# Altium PCB adl5960-devboard.PcbDoc (part 1 of 2)
Units mm, origin at the board's own origin, x right, y up, seen from the top; angles counter-clockwise.
Board outline 70 x 110 mm, 4 copper layers (Top Layer, Inner 1, Inner 2, Bottom Layer), stack 1.072 mm thick; 69 components, 54 nets, 253 pads, 0 vias.
Unrouted connection lines stored in the file: 176.
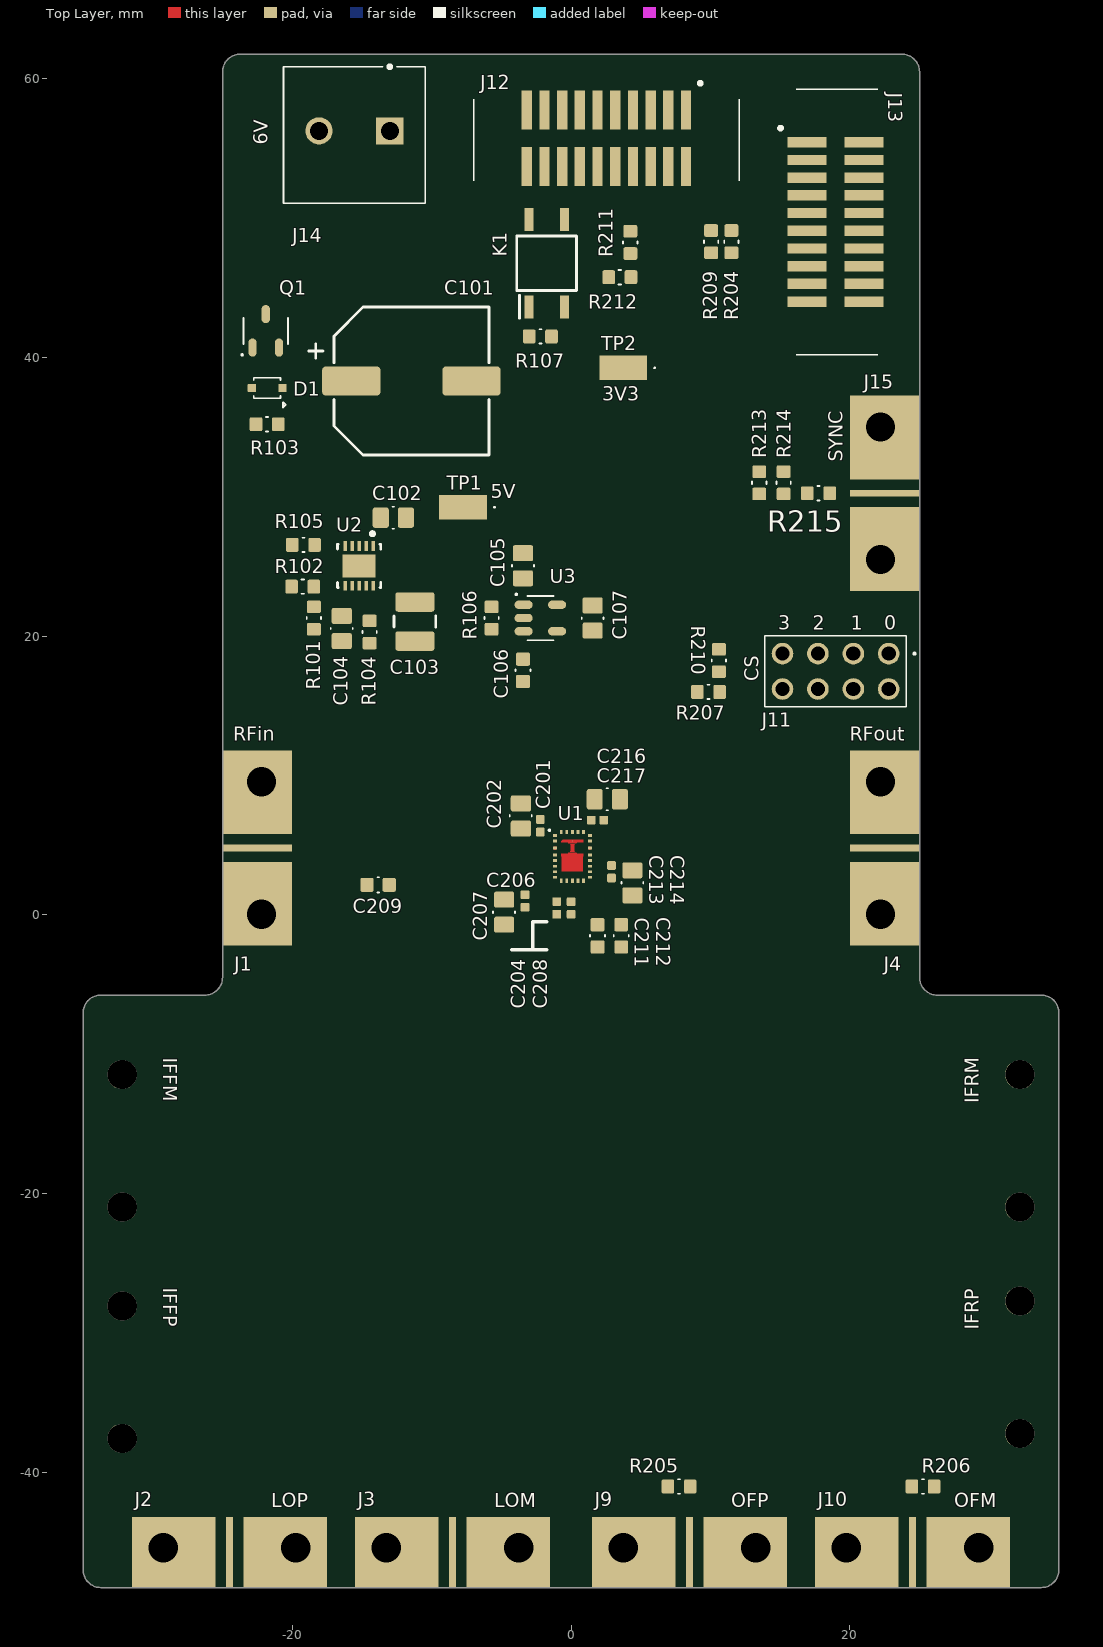
[diagram p0: Top Layer view]
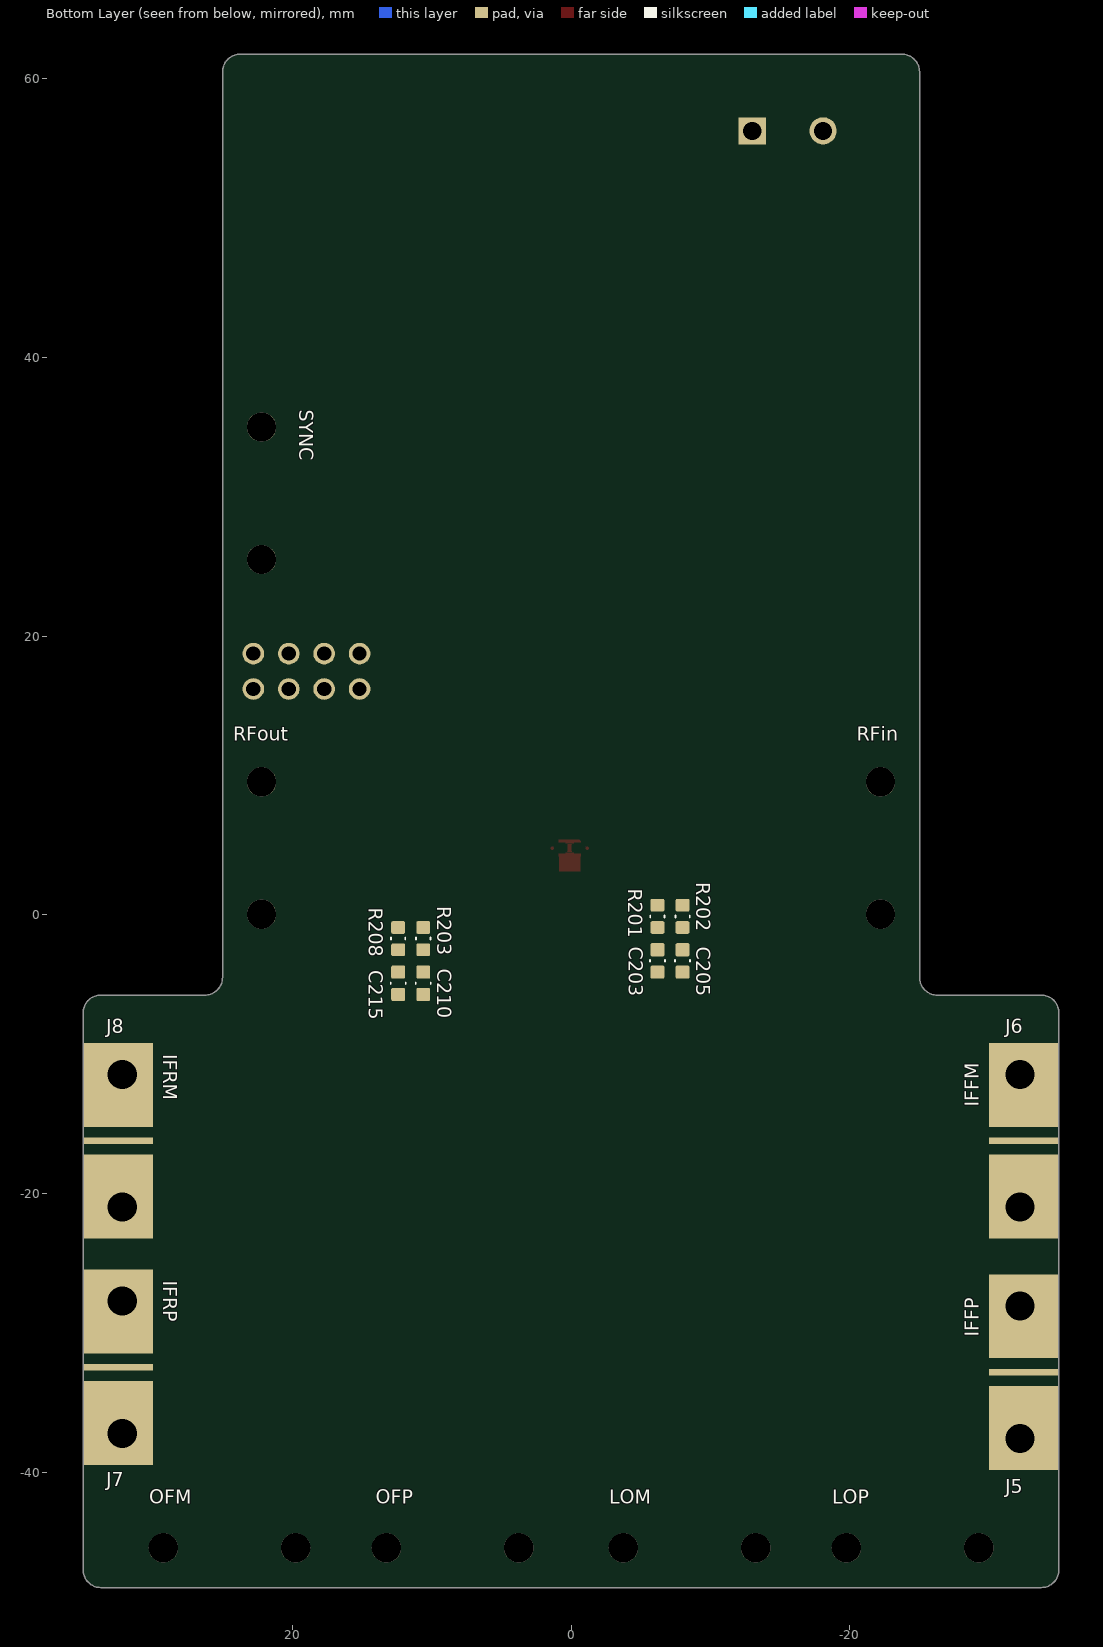
[diagram p1: Bottom Layer view, seen from below]

## Layer stack, top to bottom
Top Solder: solder mask 0.02, Solder Resist, Dk 3.9
Top Layer: signal copper 0.03
Dielectric 1: core 0.254, RO4350B, Dk 3.66
Inner 1: signal copper 0.012
Dielectric 2: prepreg 0.18, PR7628, Dk 4.8
Dielectric 3: prepreg 0.12, PR2116, Dk 4.8
Dielectric 4: prepreg 0.18, PR7628, Dk 4.8
Inner 2: signal copper 0.012
Dielectric 5: core 0.254, RO4350B, Dk 3.66
Bottom Layer: signal copper 0.03
Bottom Solder: solder mask 0.02, Solder Resist, Dk 3.9

## Board outline
-33.73,-48.25 cw(c-33.73,-46.98) -35,-46.98 -35,-7.02 cw(c-33.73,-7.02) -33.73,-5.75 -26.27,-5.75 ccw(c-26.27,-4.48) -25,-4.48 -25,60.48 cw(c-23.73,60.48) -23.73,61.75 23.73,61.75 cw(c23.73,60.48) 25,60.48 25,-4.48 ccw(c26.27,-4.48) 26.27,-5.75 33.73,-5.75 cw(c33.73,-7.02) 35,-7.02 35,-46.98 cw(c33.73,-46.98) 33.73,-48.25

## Design rules (kind name [scope] priority, off if disabled: settings)
Clearance [All] p1: gap=0.254 ignorepadtopadclearanceinfootprint=FALSE
DiffPairsRouting [All] p1: maxlimit=0.254 minlimit=0.254 mostfreqgap=0.254 toplayer_minwidth=0.381 toplayer_maxwidth=0.381 toplayer_prefwidth=0.381 midlayer1_minwidth=0.381 midlayer1_maxwidth=0.381 midlayer1_prefwidth=0.381 midlayer2_minwidth=0.381 midlayer2_maxwidth=0.381 midlayer2_prefwidth=0.381 bottomlayer_minwidth=0.381 bottomlayer_maxwidth=0.381 bottomlayer_prefwidth=0.381 maxuncoupledlength=12.7
PolygonConnect [All] p1: connectstyle=Relief reliefconductorwidth=0.254 reliefentries=4 polygonreliefangle="90 Angle" airgapwidth=0.254
RoutingVias [All] p1: holewidth=0.711 width=1.27 viastyle="Through Hole" minholewidth=0.711 minwidth=1.27 maxholewidth=0.711 maxwidth=1.27
SolderMaskExpansion [All] p1: expansion=0 istentingtop=FALSE
SupplyNets "Schematic Supply Nets_3" [InNet('+3V3')] p1: voltage=0.000
SupplyNets "Schematic Supply Nets_2" [InNet('+6')] p2: voltage=0.000
SupplyNets "Schematic Supply Nets_1" [InNet('GND')] p3: voltage=0.000
SupplyNets "Schematic Supply Nets" [InNet('+5')] p4: voltage=0.000
Width [All] p1: maxlimit=0.254 minlimit=0.254 preferedwidth=0.254
29 further rules are at their usual default settings.

## Classes and differential pairs
component class adl5960-power: C101 C102 C103 C104 C105 C106 C107 D1 J14 K1 Q1 R101 R102 R103 R104 R105 R106 R107 TP1 TP2 U2 U3
component class adl5960-main: C201 C202 C203 C204 C205 C206 C207 C208 C209 C210 C211 C212 C213 C214 C215 C216 C217 J1 J2 J3 J4 J5 J6 J7 J8 J9 J10 J11 J12 J13 J15 R201 R202 R203 R204 R205 R206 R207 R208 R209 R210 R211 R212 R213 R214 R215 U1
differential pair LO: +LO_P -LO_N
differential pair IFR: +IFR_P -IFR_N
differential pair IFF: +IFF_P -IFF_N

## Components (designator, comment, footprint, x,y, rotation, side; value= is the part's Value field where it differs from the comment)
C101 "470u" cap-ae-d10-h12.4-av -11.45,38.3 r0 top
C102 "4.7u 10%" c-0805 -12.75,28.5 r180 top value=4.7u
C103 "22u 10%" c-1210 -11.2,21.05 r90 top value=22u
C104 "470n" c-0805 -16.45,20.55 r90 top
C105 "1u 5%" c-0805 -3.45,25.05 r270 top value=1u
C106 "100n 5%" c-0603 -3.45,17.55 r90 top value=100n
C107 "1u 5%" c-0805 1.55,21.3 r90 top value=1u
C201 "1n 10%" c-0402 -2.2,6.4 r270 top value=1n
C202 "4.7u 10%" c-0805 -3.6,7.1 r90 top value=4.7u
C203 "100n 5%" c-0603 -6.2,-3.3 r270 bottom value=100n
C204 "1n 5%" c-0402 -1.025,0.5 r90 top value=1n
C205 "100n 5%" c-0603 -8,-3.3 r270 bottom value=100n
C206 "1n 10%" c-0402 -3.3,1 r270 top value=1n
C207 "4.7u 10%" c-0805 -4.8,0.2 r90 top value=4.7u
C208 "1n 5%" c-0402 0,0.5 r90 top value=1n
C209 "100n 5%" c-0603 -13.843,2.159 r0 top value=100n
C210 "100n 5%" c-0603 10.6,-4.9 r270 bottom value=100n
C211 "100n 5%" c-0603 1.9,-1.5 r90 top value=100n
C212 "100n 5%" c-0603 3.6,-1.5 r270 top value=100n
C213 "1n 10%" c-0402 2.9,3.1 r90 top value=1n
C214 "4.7u 10%" c-0805 4.4,2.3 r270 top value=4.7u
C215 "100n 5%" c-0603 12.4,-4.9 r270 bottom value=100n
C216 "4.7u 10%" c-0805 2.6,8.3 r180 top value=4.7u
C217 "1n 10%" c-0402 1.9,6.8 r0 top value=1n
D1 "BZX384-C10" sod-323 -21.8,37.8 r180 top
J1 "SMA" 32K243-40ML5 -25,4.8 r90 top
J2 "SMA" 32K243-40ML5 -24.5,-48.2 r180 top
J3 "SMA" 32K243-40ML5 -8.5,-48.2 r180 top
J4 "SMA" 32K243-40ML5 25,4.8 r270 top
J5 "SMA" 32K243-40ML5 -35,-32.8 r270 bottom
J6 "SMA" 32K243-40ML5 -35,-16.2 r270 bottom
J7 "SMA" 32K243-40ML5 35,-32.45 r90 bottom
J8 "SMA" 32K243-40ML5 35,-16.2 r90 bottom
J9 "SMA" 32K243-40ML5 8.5,-48.2 r180 top
J10 "SMA" 32K243-40ML5 24.5,-48.2 r180 top
J11 "Header 2x4" Header-2x4-THT-P2.54 22.79,18.75 r180 top
J12 "SHF-110-01-L-D-SM" SHF-110-01-L-D-SM 2.535,55.717 r180 top
J13 "SHF-110-01-L-D-SM" SHF-110-01-L-D-SM 18.968,49.715 r270 top
J14 "Screw Terminal 1x2" 1715721 -13,56.25 r180 top
J15 "DNP" 32K243-40ML5 25,30.25 r270 top
K1 "AQY412S" sop-4 -1.75,46.75 r90 top value=2.5Ω
Q1 "DMP3099L-7" sot-23-3-p0.95 -21.9,41.9 r90 top
R101 "150k 1%" r-0603 -18.45,21.3 r90 top value=150k
R102 "10k 1%" r-0603 -19.25,23.55 r180 top value=10k
R103 "100k 5%" r-0603 -21.8,35.2 r180 top value=100k
R104 "49.9k 0.1%" r-0603 -14.45,20.3 r90 top value=49.9k
R105 "430 1%" r-0603 -19.2,26.55 r0 top value=430
R106 "100k 5%" r-0603 -5.7,21.3 r90 top value=100k
R107 "330 1%" r-0603 -2.2,41.5 r0 top value=330
R201 "49.9 1%" r-0603 -6.2,-0.1 r90 bottom value=49.9
R202 "49.9 1%" r-0603 -8,-0.1 r90 bottom value=49.9
R203 "49.9 1%" r-0603 10.6,-1.7 r90 bottom value=49.9
R204 "1k 1%" r-0603 11.5,48.3 r90 top value=1k
R205 "56 1%" r-0603 7.75,-41 r0 top value=56
R206 "56 1%" r-0603 25.25,-41 r180 top value=56
R207 "1k 1%" r-0603 9.857,16 r0 top value=1k
R208 "49.9 1%" r-0603 12.4,-1.7 r90 bottom value=49.9
R209 "1k 1%" r-0603 10.05,48.3 r90 top value=1k
R210 "10k 1%" r-0603 10.607,18.25 r270 top value=10k
R211 "1k 1%" r-0603 4.25,48.25 r270 top value=1k
R212 "100k 5%" r-0603 3.5,45.75 r0 top value=100k
R213 "1k 1%" r-0603 13.5,31 r270 top value=1k
R214 "100k 5%" r-0603 15.25,31 r270 top value=100k
R215 "DNP" r-0603 17.75,30.25 r180 top value=0
TP1 "Test Point" tp-keystone-5015 -7.75,29.25 r180 top
TP2 "Test Point" tp-keystone-5015 3.75,39.25 r180 top
U1 "ADL5960ACCZ" ADL5960ACCZ 0.1,4.2 r0 top
U2 "LT3045" LT3045HDD -15.2,25.05 r270 top
U3 "TLV75533" sot-23-5-p0.95 -2.2,21.3 r0 top

## Footprints (in the part's own frame and the unit in brackets; to place one, negate y for a bottom-side part, rotate by r counter-clockwise, add the part's x,y. Pads: shape width x height; smd on the part's side, far side on the other; paste and mask are expansions set on the pad)
32K243-40ML5 [mm]
  rect 0.48x5 smd paste+0: 1(0,-2.5)
  rect 6x5 smd paste+0: 2(-4,-2.5) 2(4,-2.5)
  round 2.1 hole 2.1 unplated: MH1(-4.75,-2.8) MH2(4.75,-2.8)
  body extent -7,-5 7,9.5, height 4.88
1715721 [mm] "Single-row, 2-pin screw terminal. Phoenix Contact 1715721"
  rect 1.95x1.95 hole 1.3: 1(0,0)
  round 1.95 hole 1.3: 2(5.08,0)
  silkscreen extent -2.54,-4.65 7.62,5.2, body extent -3.18,-4.61 7.55,5.22, height 14.2
ADL5960ACCZ [mm] "LGA, 26-Leads, Body 3.00x4.00mmx0.78mm"
  rect 0.3x0.2 smd: 1(-1.25,1.5) 2(-1.25,1.1) 3(-1.25,0.6) 4(-1.25,0.1) 5(-1.25,-0.3) 6(-1.25,-0.7) 7(-1.25,-1.1) 8(-1.25,-1.5) 14(1.25,-1.5) 15(1.25,-1.1) 16(1.25,-0.7) 17(1.25,-0.3) 18(1.25,0.1) 19(1.25,0.6) 20(1.25,1.1) 21(1.25,1.5)
  rect 0.2x0.3 smd: 9(-0.8,-1.75) 10(-0.4,-1.75) 11(0,-1.75) 12(0.4,-1.75) 13(0.8,-1.75) 22(0.8,1.75) 23(0.4,1.75) 24(0,1.75) 25(-0.4,1.75) 26(-0.8,1.75)
  round 0.025 smd: 27(-0.025,0.625) 27(0.025,1.1) 27(0.05,-0.375)
  silkscreen extent -1.71,1.81 -1.59,1.94, body extent -1.5,-2 1.5,2, height 0.68
c-0402 [mm] "Chip Capacitor, 2-Leads, Body 1.00x0.50mm, IPC Medium Density"
  rrect25% 0.62x0.62 smd: 1(-0.45,0) 2(0.45,0)
  body extent -0.5,-0.23 0.5,0.27, height 0.5
c-0603 [mm] "Chip Capacitor, 2-Leads, Body 1.60x0.80mm, IPC Medium Density"
  rrect25% 0.95x1 smd: 1(-0.8,0) 2(0.8,0)
  silkscreen extent -0.06,-0.54 0.06,0.54, body extent -0.8,-0.4 0.8,0.4, height 0.8
c-0805 [mm] "Chip Capacitor, 2-Leads, Body 2.00x1.25mm, IPC Medium Density"
  rrect25% 1.15x1.45 smd: 1(-0.9,0) 2(0.9,0)
  silkscreen extent -0.06,-0.79 0.06,0.79, body extent -1,-0.63 1,0.63, height 1.25
c-1210 [mm] "Chip Capacitor, 2-Leads, Body 3.20x2.50mm, IPC Medium Density"
  rrect25% 1.4x2.8 smd: 1(-1.4,0) 2(1.4,0)
  silkscreen extent -0.4,-1.5 0.4,1.5, body extent -1.6,-1.25 1.6,1.25, height 2.02
cap-ae-d10-h12.4-av [mm] "Aluminium electrolytic/polymer V-chip, D10 x H12.4, anti-vibration (KEMET MS-AV), body 10.80x10.30x12.90 mm max, pads per KEMET A786 datasheet"
  rrect25% 4.175x2.1 smd: 1(-4.313,0) 2(4.312,0)
  silkscreen extent -7.37,-5.31 5.56,5.31, body extent -5.6,-5.24 5.6,5.24, height 13.24
Header-2x4-THT-P2.54 [mm] "2x4 vertical male pin header, 2.54 mm pitch, plated through-hole, 8 positions."
  round 1.55 hole 1.02: 1(0,0) 2(0,2.54) 3(2.54,0) 4(2.54,2.54) 5(5.08,0) 6(5.08,2.54) 7(7.62,0) 8(7.62,2.54)
  silkscreen extent -1.9,-1.27 8.89,3.81, body extent -1.28,-1.27 8.88,3.81, height 8.13
LT3045HDD [mm]
  rect 0.7x0.25 smd paste+0 mask+0: 1(-1.425,1) 2(-1.425,0.5) 3(-1.425,0) 4(-1.425,-0.5) 5(-1.425,-1) 6(1.425,-1) 7(1.425,-0.5) 8(1.425,0) 9(1.425,0.5) 10(1.425,1)
  rect 1.65x2.38 smd paste+0 mask+0: 11(0,0)
  silkscreen extent -2.42,-1.55 1.55,1.55, body extent -1.88,-1.65 1.88,1.65, height 0.25
r-0603 [mm] "Chip Resistor, 2-Leads, Body 1.60x0.80mm, IPC Medium Density"
  rrect25% 0.9x1 smd: 1(-0.8,0) 2(0.8,0)
  silkscreen extent -0.09,-0.51 0.09,0.51, body extent -0.85,-0.45 0.85,0.45, height 0.55
SHF-110-01-L-D-SM [mm]
  rect 0.74x2.795 smd: 1(-5.715,-2.033) 2(-5.715,2.033) 3(-4.445,-2.033) 4(-4.445,2.033) 5(-3.175,-2.033) 6(-3.175,2.033) 7(-1.905,-2.033) 8(-1.905,2.033) 9(-0.635,-2.033) 10(-0.635,2.033) 11(0.635,-2.033) 12(0.635,2.033) 13(1.905,-2.033) 14(1.905,2.033) 15(3.175,-2.033) 16(3.175,2.033) 17(4.445,-2.033) 18(4.445,2.033) 19(5.715,-2.033) 20(5.715,2.033)
  silkscreen extent -9.53,-3.99 9.53,3.05, body extent -9.53,-3.05 9.53,3.05, height 5.33
sod-323 [mm] "SOD-323, 2 leads, 1.7x1.25x1.1 mm"
  rrect25% 0.6x0.6 smd: 1(-1.1,0) 2(1.1,0)
  silkscreen extent -1.34,-0.74 0.96,1.4, body extent -1.24,-0.62 1.24,0.63, height 0.94
sop-4 [mm]
  rect 1.65x0.65 smd: 1(-3.125,1.27) 2(-3.125,-1.27) 3(3.125,-1.27) 4(3.125,1.27)
  silkscreen extent -3.95,-2.15 1.95,2.15, body extent -3.4,-2.15 3.4,2.15, height 2.11
sot-23-3-p0.95 [mm] "SOT23, 3-Leads, Body 2.90x2.80mm, Pitch 0.95mm, IPC Medium Density"
  oval 1.3x0.6 smd: 1(-1.2,0.95) 2(-1.2,-0.95) 3(1.2,0)
  silkscreen extent -1.79,-1.59 0.94,1.76, body extent -1.25,-1.5 1.25,1.5, height 1.2
sot-23-5-p0.95 [mm] "SOT23, 5-Leads, Body 2.90x2.80mm, Pitch 0.95mm, IPC Medium Density"
  oval 1.3x0.6 smd: 1(-1.2,0.95) 2(-1.2,0) 3(-1.2,-0.95) 4(1.2,-0.95) 5(1.2,0.95)
  silkscreen extent -1.79,-1.59 0.94,1.76, body extent -1.4,-1.45 1.4,1.45, height 1.55
tp-keystone-5015 [mm]
  rect 3.43x1.78 smd: 1(0,0)
  silkscreen extent -2.3,-0.05 -2.2,0.05, body extent -1.33,-0.51 1.33,0.51, height 1.52

## Part data
C101: library part Capacitor-Polar, "Polarized capacitor", Manufacturer=KEMET, Manufacturer Part Number=A786MS477M1ELAV012, Tolerance=20%, Voltage Rating=25V
C102 C202 C207 C214 C216: library part Capacitor, "Generic non-polarized capacitor", Dielectric=X7R, Manufacturer=KEMET, Manufacturer Part Number=C0805C475K4RACTU, Tolerance=10%, Voltage Rating=16V
C103: library part Capacitor, "Generic non-polarized capacitor", Dielectric=X7R, Manufacturer=KEMET, Manufacturer Part Number=C1210C226K4RACTU, Tolerance=10%, Voltage Rating=16V
C104: library part Capacitor, "Generic non-polarized capacitor", Dielectric=X7R, Manufacturer=KEMET, Manufacturer Part Number=C0805C474J4RACAUTO, Tolerance=5%, Voltage Rating=16V
C105 C107: library part Capacitor, "Generic non-polarized capacitor", Dielectric=X7R, Manufacturer=KEMET, Manufacturer Part Number=C0805C105J4RAC7210, Tolerance=5%, Voltage Rating=16V
C106 C203 C205 C209 C210 C211 C212 C215: library part Capacitor, "Generic non-polarized capacitor", Dielectric=X7R, Manufacturer=KEMET, Manufacturer Part Number=C0603C104J4RACTU, Tolerance=5%, Voltage Rating=16V
C201 C206 C213 C217: library part capacitor, "Generic non-polarized capacitor", Dielectric=C0G, Manufacturer=KEMET, Manufacturer Part Number=C0402C102K8GACTU, Tolerance=10%, Voltage Rating=10V
C204 C208: library part Capacitor, "Generic non-polarized capacitor", Dielectric=C0G, Manufacturer=KEMET, Manufacturer Part Number=C0402C102J4GACTU, Tolerance=5%, Voltage Rating=16V
D1: library part BZX384-C10,115, "Diode Zener Single 10V 5% 300mW 2-Pin SOD-323 T/R", Case/Package=SC, Collector Emitter Breakdown Voltage=32V, Collector Emitter Saturation Voltage=-300mV, Manufacturer=Nexperia, Manufacturer Lifecycle Status="RELEASED FOR SUPPLY", Max Collector Current=100mA, Max Operating Temperature=150°C, Max Power Dissipation=300mW, Max Reverse Leakage Current=200nA, Min Operating Temperature=-65°C, Ratings=AEC-Q101, Reference Voltage=10V, Reverse Standoff Voltage=7V, Supplier Part Number=1787095, Test Current=5mA, Tolerance=5%, Category="Zener Diodes", China RoHS=Compliant, ComponentLink1Description=https://datasheet.octopart.com:443/BZX384-C10%2C115-Nexperia-datasheet-8360268.pdf?src-supplier=IHS, ComponentLink1URL=https://datasheet.octopart.com:443/BZX384-C10%2C115-Nexperia-datasheet-8360268.pdf?src-supplier=IHS, ComponentLink2Description=https://datasheet.octopart.com:443/BZX384-C10%2C115-Nexperia-datasheet-155662751.pdf?src-supplier=Newark, ComponentLink2URL=https://datasheet.octopart.com:443/BZX384-C10%2C115-Nexperia-datasheet-155662751.pdf?src-supplier=Newark, ComponentLink3Description=https://datasheet.octopart.com:443/BZX384-C10%2C115-NXP-Semiconductors-datasheet-10052903.pdf?src-supplier=Newark, ComponentLink3URL=https://datasheet.octopart.com:443/BZX384-C10%2C115-NXP-Semiconductors-datasheet-10052903.pdf?src-supplier=Newark, ComponentLink4Description=https://datasheet.octopart.com:443/BZX384-C10%2C115-Nexperia-datasheet-79471522.pdf?src-supplier=LKR, ComponentLink4URL=https://datasheet.octopart.com:443/BZX384-C10%2C115-Nexperia-datasheet-79471522.pdf?src-supplier=LKR, ComponentLink5Description=https://datasheet.octopart.com:443/BZX384-C10%2C115-Nexperia-datasheet-68321567.pdf?src-supplier=element14+APAC, ComponentLink5URL=https://datasheet.octopart.com:443/BZX384-C10%2C115-Nexperia-datasheet-68321567.pdf?src-supplier=element14+APAC, ComponentLink6Description=https://datasheet.octopart.com:443/BZX384-C10%2C115-Nexperia-datasheet-105678879.pdf?src-supplier=TME, ComponentLink6URL=https://datasheet.octopart.com:443/BZX384-C10%2C115-Nexperia-datasheet-105678879.pdf?src-supplier=TME, ComponentLink7Description=https://datasheet.octopart.com:443/BZX384-C10%2C115-Nexperia-datasheet-194695641.pdf?src-supplier=HQonline, ComponentLink7URL=https://datasheet.octopart.com:443/BZX384-C10%2C115-Nexperia-datasheet-194695641.pdf?src-supplier=HQonline, ComponentLink8Description=http://sigma.octopart.com:80/reach_statement/NXP-Semiconductors-company-13.pdf?src-supplier=Compliance+Statements, ComponentLink8URL=http://sigma.octopart.com:80/reach_statement/NXP-Semiconductors-company-13.pdf?src-supplier=Compliance+Statements, ComponentLink9Description=http://sigma.octopart.com:80/rohs_statement/NXP-Semiconductors-company-12.pdf?src-supplier=Compliance+Statements, ComponentLink9URL=http://sigma.octopart.com:80/rohs_statement/NXP-Semiconductors-company-12.pdf?src-supplier=Compliance+Statements, Composition=Zener, Contact Plating=Tin, Country of Origin="Mainland China", Element Configuration=Single, ESD Protection=No, Export Control Classification Number (ECCN) Code=EAR99, Harmonized Tariff Schedule (HTS) Code=8541.10.00.50, Height=1.05mm, hFE Min=215, Impedance=20Ω, Introduction Date=2004-03-23, Lead Free="Lead Free", Length=1.8mm, Lifecycle Status=Production, Manufacturer Part Number=BZX384-C10,115, Mounting Technology="Surface Mount", Number of Elements=1, Number of Terminals=2, Peak Reverse Current=200nA, Pins=2, Polarity=Unidirectional, Power Dissipation=300mW, Radiation Hardening=No, REACH SVHC=Unaffected, RoHS=Compliant, Schedule B="8541100050, 8541100050|8541100050|8541100050|8541100050|8541100050", Stock=23400, Supplier=RS, Termination=SMD/SMT, Voltage Tolerance=5%, Weight=4.535924g, Width=1.35mm, Zener Current=5mA, Zener Voltage=10V
J1 J2 J3 J4 J5 J6 J7 J8 J9 J10: library part 32K243-40ML5, "Rf Coaxial Connector, 50 Ohm, In-series, Sma Right Angle Jack Pcb, Sma Series", Ambient Temperature Range High=165°C, Contact Resistance=3mΩ, Dielectric Material=PTFE, Frequency=18GHz, Insulation Resistance=5GΩ, Manufacturer=Rosenberger, Min Operating Temperature=-65°C, Supplier Part Number=476-32K243-40ML5, Voltage Rating=480V, Case/Package=SMA, Category="RF / Coaxial Connectors", China RoHS=Non-Compliant, ComponentLink1Description=https://sigma.octopart.com:443/138897775/technical_drawing/Rosenberger-32K243-40ML5.pdf?src-supplier=Upverter, ComponentLink1URL=https://sigma.octopart.com:443/138897775/technical_drawing/Rosenberger-32K243-40ML5.pdf?src-supplier=Upverter, ComponentLink2Description=https://datasheet.octopart.com:443/32K243-40ML5-Rosenberger-datasheet-136490776.pdf?src-supplier=Upverter, ComponentLink2URL=https://datasheet.octopart.com:443/32K243-40ML5-Rosenberger-datasheet-136490776.pdf?src-supplier=Upverter, ComponentLink3Description=https://datasheet.octopart.com:443/32K243-40ML5-Rosenberger-datasheet-181232220.pdf?src-supplier=IHS, ComponentLink3URL=https://datasheet.octopart.com:443/32K243-40ML5-Rosenberger-datasheet-181232220.pdf?src-supplier=IHS, ComponentLink4Description=https://datasheet.octopart.com:443/32K243-40ML5-Rosenberger-datasheet-154574681.pdf?src-supplier=RS+(Formerly+Allied+Electronics), ComponentLink4URL=https://datasheet.octopart.com:443/32K243-40ML5-Rosenberger-datasheet-154574681.pdf?src-supplier=RS+(Formerly+Allied+Electronics), Contact Material=Gold, Contact Plating=Gold, Contact Style=Coax, Export Control Classification Number (ECCN) Code=EAR99, Fastening Type=Threaded, Gender=Female, Harmonized Tariff Schedule (HTS) Code=8536.69.40.10, Impedance=50Ω, Insertion Loss (dB)=0.17dB, Introduction Date=2007-04-18, Lifecycle Status=Production, Manufacturer Package Identifier=32K243-40ML5, Manufacturer Part Number=32K243-40ML5, Max Operating Temperature=165°C, Number of Contacts=1, Number of Ports=1, Number of Positions=1, Orientation="Right Angle", Pricing="1=20.21, 10=17.36, 50=15.71, 100=14.66, 1000=13.36, 10000=13.36 (USD)", REACH SVHC=Affected, RoHS=Compliant, Stock=5444, Supplier=Mouser, Supplier 1=Mouser, Supplier Part Number 1=476-32K243-40ML5
J11: library part Header-2x4, "Dual-row, 8-pin connector", Manufacturer=Samtec, Manufacturer Part Number=TSW-104-07-G-D
J12 J13: "Pin Header, Wire-to-Board, 1.27 mm, 2 Rows, 20 Contacts, Surface Mount, SHF Series", Housing Color=Black, Manufacturer=Samtec, Manufacturer Lifecycle Status=PRODUCTION, Max Current Rating=3A, Max Operating Temperature=125°C, Min Operating Temperature=-55°C, Supplier Part Number=9011876, Category="Headers and Wire Housings", ComponentLink1Description=https://sigma.octopart.com:443/97277425/technical_drawing/Samtec-SHF-110-01-L-D-SM.pdf?src-supplier=Samtec, ComponentLink1URL=https://sigma.octopart.com:443/97277425/technical_drawing/Samtec-SHF-110-01-L-D-SM.pdf?src-supplier=Samtec, ComponentLink2Description=https://datasheet.octopart.com:443/SHF-110-01-L-D-SM-Samtec-datasheet-96974960.pdf?src-supplier=Samtec, ComponentLink2URL=https://datasheet.octopart.com:443/SHF-110-01-L-D-SM-Samtec-datasheet-96974960.pdf?src-supplier=Samtec, ComponentLink3Description=https://datasheet.octopart.com:443/SHF-110-01-L-D-SM-Samtec-datasheet-118492834.pdf?src-supplier=Sager+Electronics, ComponentLink3URL=https://datasheet.octopart.com:443/SHF-110-01-L-D-SM-Samtec-datasheet-118492834.pdf?src-supplier=Sager+Electronics, ComponentLink4Description=https://datasheet.octopart.com:443/SHF-110-01-L-D-SM-Samtec-datasheet-154853690.pdf?src-supplier=Sager+Electronics, ComponentLink4URL=https://datasheet.octopart.com:443/SHF-110-01-L-D-SM-Samtec-datasheet-154853690.pdf?src-supplier=Sager+Electronics, ComponentLink5Description=https://datasheet.octopart.com:443/SHF-110-01-L-D-SM-Samtec-datasheet-41643068.pdf?src-supplier=Newark, ComponentLink5URL=https://datasheet.octopart.com:443/SHF-110-01-L-D-SM-Samtec-datasheet-41643068.pdf?src-supplier=Newark, ComponentLink6Description=https://datasheet.octopart.com:443/SHF-110-01-L-D-SM-Samtec-datasheet-14716432.pdf?src-supplier=Newark, ComponentLink6URL=https://datasheet.octopart.com:443/SHF-110-01-L-D-SM-Samtec-datasheet-14716432.pdf?src-supplier=Newark, ComponentLink7Description=https://datasheet.octopart.com:443/SHF-110-01-L-D-SM-Samtec-datasheet-63880525.pdf?src-supplier=Newark, ComponentLink7URL=https://datasheet.octopart.com:443/SHF-110-01-L-D-SM-Samtec-datasheet-63880525.pdf?src-supplier=Newark, ComponentLink8Description=https://datasheet.octopart.com:443/SHF-110-01-L-D-SM-Samtec-datasheet-21214285.pdf?src-supplier=Newark, ComponentLink8URL=https://datasheet.octopart.com:443/SHF-110-01-L-D-SM-Samtec-datasheet-21214285.pdf?src-supplier=Newark, ComponentLink9Description=https://datasheet.octopart.com:443/SHF-110-01-L-D-SM-Samtec-datasheet-118892784.pdf?src-supplier=Master+Electronics, ComponentLink9URL=https://datasheet.octopart.com:443/SHF-110-01-L-D-SM-Samtec-datasheet-118892784.pdf?src-supplier=Master+Electronics, ComponentLink10Description=https://datasheet.octopart.com:443/SHF-110-01-L-D-SM-Samtec-datasheet-116534221.pdf?src-supplier=Toby+Electronics, ComponentLink10URL=https://datasheet.octopart.com:443/SHF-110-01-L-D-SM-Samtec-datasheet-116534221.pdf?src-supplier=Toby+Electronics, ComponentLink11Description=https://datasheet.octopart.com:443/SHF-110-01-L-D-SM-Samtec-datasheet-116536228.pdf?src-supplier=Toby+Electronics, ComponentLink11URL=https://datasheet.octopart.com:443/SHF-110-01-L-D-SM-Samtec-datasheet-116536228.pdf?src-supplier=Toby+Electronics, ComponentLink12Description=https://datasheet.octopart.com:443/SHF-110-01-L-D-SM-Samtec-datasheet-14716430.pdf?src-supplier=Farnell, ComponentLink12URL=https://datasheet.octopart.com:443/SHF-110-01-L-D-SM-Samtec-datasheet-14716430.pdf?src-supplier=Farnell, Contact Material=Bronze, Contact Plating=Gold, Depth=5.59mm, Gender=Male, Housing Material=Polymer, Length=19.05mm, Lifecycle Status=Production, Manufacturer Part Number=SHF-110-01-L-D-SM, Number of Contacts=20, Number of Rows=2, Orientation=Straight, Pins=20, Pitch=1.27mm, Radiation Hardening=No, REACH SVHC=Unaffected, RoHS=Compliant, Stock=708, Supplier=RS, Termination=Solder
J14: library part Screw-Terminal-01x02, "Terminal Block; 17.5 A; 250 V; 5.08 mm; 26 to 14 AWG; 2; Screw; Solder; 4 kV", Color=Green, Current=15A, Current Rating=17.5A, Flammability Rating="UL94 V-0", Manufacturer="Phoenix Contact", Manufacturer Lifecycle Status=AVAILABLE, Manufacturer Part Number=1715721, Max Current Rating=22A, Max Operating Temperature=105°C, Max Supply Voltage=250V, Min Operating Temperature=-40°C, Supplier Part Number=1930564, Test Voltage=4kV, Voltage=300V, Voltage Rating=400V, Approvals="CSA, cUL", Category="Terminal Blocks", China RoHS=Compliant, ComponentLink1Description=https://datasheet.octopart.com:443/1715721-Phoenix-Contact-datasheet-195288929.pdf?src-supplier=Phoenix+Contact, ComponentLink1URL=https://datasheet.octopart.com:443/1715721-Phoenix-Contact-datasheet-195288929.pdf?src-supplier=Phoenix+Contact, ComponentLink2Description=https://sigma.octopart.com:443/195221700/technical_drawing/Phoenix-Contact-1715721.pdf?src-supplier=Phoenix+Contact, ComponentLink2URL=https://sigma.octopart.com:443/195221700/technical_drawing/Phoenix-Contact-1715721.pdf?src-supplier=Phoenix+Contact, ComponentLink3Description=https://datasheet.octopart.com:443/1715721-Phoenix-Contact-datasheet-62122377.pdf?src-supplier=Upverter, ComponentLink3URL=https://datasheet.octopart.com:443/1715721-Phoenix-Contact-datasheet-62122377.pdf?src-supplier=Upverter, ComponentLink4Description=https://datasheet.octopart.com:443/1715721-Phoenix-Contact-datasheet-181073212.pdf?src-supplier=IHS, ComponentLink4URL=https://datasheet.octopart.com:443/1715721-Phoenix-Contact-datasheet-181073212.pdf?src-supplier=IHS, ComponentLink5Description=https://datasheet.octopart.com:443/1715721-Phoenix-Contact-datasheet-66579234.pdf?src-supplier=Master+Electronics, ComponentLink5URL=https://datasheet.octopart.com:443/1715721-Phoenix-Contact-datasheet-66579234.pdf?src-supplier=Master+Electronics, ComponentLink6Description=https://datasheet.octopart.com:443/1715721-Phoenix-Contact-datasheet-14715205.pdf?src-supplier=Newark, ComponentLink6URL=https://datasheet.octopart.com:443/1715721-Phoenix-Contact-datasheet-14715205.pdf?src-supplier=Newark, ComponentLink7Description=https://datasheet.octopart.com:443/1715721-Phoenix-Contact-datasheet-499485.pdf?src-supplier=Newark, ComponentLink7URL=https://datasheet.octopart.com:443/1715721-Phoenix-Contact-datasheet-499485.pdf?src-supplier=Newark, ComponentLink8Description=https://datasheet.octopart.com:443/1715721-Phoenix-Contact-datasheet-154778360.pdf?src-supplier=Electro+Sonic, ComponentLink8URL=https://datasheet.octopart.com:443/1715721-Phoenix-Contact-datasheet-154778360.pdf?src-supplier=Electro+Sonic, ComponentLink9Description=https://datasheet.octopart.com:443/1715721-Phoenix-Contact-datasheet-9792235.pdf?src-supplier=TodayComponents, ComponentLink9URL=https://datasheet.octopart.com:443/1715721-Phoenix-Contact-datasheet-9792235.pdf?src-supplier=TodayComponents, ComponentLink10Description=https://datasheet.octopart.com:443/1715721-Phoenix-Contact-datasheet-166145896.pdf?src-supplier=Burklin+Elektronik, ComponentLink10URL=https://datasheet.octopart.com:443/1715721-Phoenix-Contact-datasheet-166145896.pdf?src-supplier=Burklin+Elektronik, ComponentLink11Description=https://datasheet.octopart.com:443/1715721-Phoenix-Contact-datasheet-33452854.pdf?src-supplier=MRO+Stop, ComponentLink11URL=https://datasheet.octopart.com:443/1715721-Phoenix-Contact-datasheet-33452854.pdf?src-supplier=MRO+Stop, ComponentLink12Description=https://datasheet.octopart.com:443/1715721-Phoenix-Contact-datasheet-8332660.pdf?src-supplier=Future+Electronics, ComponentLink12URL=https://datasheet.octopart.com:443/1715721-Phoenix-Contact-datasheet-8332660.pdf?src-supplier=Future+Electronics, ComponentLink13Description=https://datasheet.octopart.com:443/1715721-Phoenix-Contact-datasheet-19322.pdf?src-supplier=RS+(Formerly+Allied+Electronics), ComponentLink13URL=https://datasheet.octopart.com:443/1715721-Phoenix-Contact-datasheet-19322.pdf?src-supplier=RS+(Formerly+Allied+Electronics), ComponentLink14Description=https://datasheet.octopart.com:443/1715721-Phoenix-Contact-datasheet-84424.pdf?src-supplier=DigiKey, ComponentLink14URL=https://datasheet.octopart.com:443/1715721-Phoenix-Contact-datasheet-84424.pdf?src-supplier=DigiKey, ComponentLink15Description=http://sigma.octopart.com:80/195206437/materials_sheet/Phoenix-Contact-1715721.pdf?src-supplier=Compliance+Statements, ComponentLink15URL=http://sigma.octopart.com:80/195206437/materials_sheet/Phoenix-Contact-1715721.pdf?src-supplier=Compliance+Statements, Connector Type="PCB, Screw, Terminal Block", Contact Material=Tin, Country of Origin=Germany, Depth=9.8mm, Export Control Classification Number (ECCN) Code=EAR99, Harmonized Tariff Schedule (HTS) Code=8536.90.40.00, Height=17.3mm, Housing Color=Green, Insulation Material=Nylon, Introduction Date=1998-01-15, Lead Free="Lead Free", Lead Pitch=5.08mm, Length=10.16mm, Lifecycle Status=Production, Mounting Technology=Screw, Number of Circuits=2, Number of Contacts=2, Number of Levels=1, Number of Poles=2, Number of Positions=2, Number of Positions Per Level=2, Number of Rows=1, Orientation=Straight, Packaging=Box, Pins=2, Pitch=5.08mm, Radiation Hardening=No, REACH SVHC=Unaffected, RoHS=Compliant, Stock=3745, Stripping Length=7mm, Supplier=RS, Termination=Screw, Voltage Rating (AC)=250V, Weight=2.939987g, Width=17.3mm, Wire Gauge (Max)=26AWG, Wire Gauge (Min)=26AWG, Wire/Cable Gauge=14AWG
J15: library part 32K243-40ML5, "Rf Coaxial Connector, 50 Ohm, In-series, Sma Right Angle Jack Pcb, Sma Series", Ambient Temperature Range High=165°C, Case/Package=SMA, Contact Resistance=3mΩ, Dielectric Material=PTFE, Frequency=18GHz, Insulation Resistance=5GΩ, Manufacturer=Rosenberger, Min Operating Temperature=-65°C, Supplier Part Number=476-32K243-40ML5, Voltage Rating=480V, Category="RF / Coaxial Connectors", China RoHS=Non-Compliant, ComponentLink1Description=https://sigma.octopart.com:443/138897775/technical_drawing/Rosenberger-32K243-40ML5.pdf?src-supplier=Upverter, ComponentLink1URL=https://sigma.octopart.com:443/138897775/technical_drawing/Rosenberger-32K243-40ML5.pdf?src-supplier=Upverter, ComponentLink2Description=https://datasheet.octopart.com:443/32K243-40ML5-Rosenberger-datasheet-136490776.pdf?src-supplier=Upverter, ComponentLink2URL=https://datasheet.octopart.com:443/32K243-40ML5-Rosenberger-datasheet-136490776.pdf?src-supplier=Upverter, ComponentLink3Description=https://datasheet.octopart.com:443/32K243-40ML5-Rosenberger-datasheet-181232220.pdf?src-supplier=IHS, ComponentLink3URL=https://datasheet.octopart.com:443/32K243-40ML5-Rosenberger-datasheet-181232220.pdf?src-supplier=IHS, ComponentLink4Description=https://datasheet.octopart.com:443/32K243-40ML5-Rosenberger-datasheet-154574681.pdf?src-supplier=RS+(Formerly+Allied+Electronics), ComponentLink4URL=https://datasheet.octopart.com:443/32K243-40ML5-Rosenberger-datasheet-154574681.pdf?src-supplier=RS+(Formerly+Allied+Electronics), Contact Material=Gold, Contact Plating=Gold, Contact Style=Coax, Export Control Classification Number (ECCN) Code=EAR99, Fastening Type=Threaded, Gender=Female, Harmonized Tariff Schedule (HTS) Code=8536.69.40.10, Impedance=50Ω, Insertion Loss (dB)=0.17dB, Introduction Date=2007-04-18, Lifecycle Status=Production, Manufacturer Package Identifier=32K243-40ML5, Manufacturer Part Number=32K243-40ML5, Max Operating Temperature=165°C, Number of Contacts=1, Number of Ports=1, Number of Positions=1, Orientation="Right Angle", Pricing="1=20.21, 10=17.36, 50=15.71, 100=14.66, 1000=13.36, 10000=13.36 (USD)", REACH SVHC=Affected, RoHS=Compliant, Stock=5444, Supplier=Mouser, Supplier 1=Mouser, Supplier Part Number 1=476-32K243-40ML5
K1: "RELAY OPTO 60V 0.5A SOP4 / Solid State Relay 50mA 1.5V DC-IN 0.5A 60V AC/DC-OUT 4-Pin SOP Tube", Case/Package=SOP, Contact Resistance=1Ω, Current Rating=500mA, Forward Current=5mA, Input Current=900µA, Isolation Voltage=1500Vrms, Manufacturer=Panasonic, Manufacturer Lifecycle Status=ACTIVE, Max Input Current=50mA, Max Operating Temperature=85°C, Max Output Voltage=60V, Min Operating Temperature=-40°C, On-State Resistance=2.5Ω, Test Voltage=1.5kV, Approvals="VDE, cULus", Category="Solid State Relays", ComponentLink1Description=https://datasheet.octopart.com:443/AQY412S-Panasonic-datasheet-101746478.pdf?src-supplier=IHS, ComponentLink1URL=https://datasheet.octopart.com:443/AQY412S-Panasonic-datasheet-101746478.pdf?src-supplier=IHS, ComponentLink2Description=https://datasheet.octopart.com:443/AQY412S-Panasonic-datasheet-109899.pdf?src-supplier=Future+Electronics, ComponentLink2URL=https://datasheet.octopart.com:443/AQY412S-Panasonic-datasheet-109899.pdf?src-supplier=Future+Electronics, ComponentLink3Description=https://datasheet.octopart.com:443/AQY412S-Panasonic-datasheet-11045713.pdf?src-supplier=Future+Electronics, ComponentLink3URL=https://datasheet.octopart.com:443/AQY412S-Panasonic-datasheet-11045713.pdf?src-supplier=Future+Electronics, ComponentLink4Description=https://datasheet.octopart.com:443/AQY412S-Panasonic-datasheet-31679424.pdf?src-supplier=Electro+Sonic, ComponentLink4URL=https://datasheet.octopart.com:443/AQY412S-Panasonic-datasheet-31679424.pdf?src-supplier=Electro+Sonic, ComponentLink5Description=https://datasheet.octopart.com:443/AQY412S-Panasonic-datasheet-26528092.pdf?src-supplier=Electro+Sonic, ComponentLink5URL=https://datasheet.octopart.com:443/AQY412S-Panasonic-datasheet-26528092.pdf?src-supplier=Electro+Sonic, ComponentLink6Description=https://datasheet.octopart.com:443/AQY412S-Panasonic-datasheet-8857770.pdf?src-supplier=element14, ComponentLink6URL=https://datasheet.octopart.com:443/AQY412S-Panasonic-datasheet-8857770.pdf?src-supplier=element14, ComponentLink7Description=https://datasheet.octopart.com:443/AQY412S-Panasonic-datasheet-12514924.pdf?src-supplier=element14, ComponentLink7URL=https://datasheet.octopart.com:443/AQY412S-Panasonic-datasheet-12514924.pdf?src-supplier=element14, ComponentLink8Description=https://datasheet.octopart.com:443/AQY412S-Panasonic-datasheet-57363625.pdf?src-supplier=element14+APAC, ComponentLink8URL=https://datasheet.octopart.com:443/AQY412S-Panasonic-datasheet-57363625.pdf?src-supplier=element14+APAC, ComponentLink9Description=https://datasheet.octopart.com:443/AQY412S-Panasonic-datasheet-142674666.pdf?src-supplier=Master+Electronics, ComponentLink9URL=https://datasheet.octopart.com:443/AQY412S-Panasonic-datasheet-142674666.pdf?src-supplier=Master+Electronics, ComponentLink10Description=https://datasheet.octopart.com:443/AQY412S-Panasonic-datasheet-9700424.pdf?src-supplier=RS+(Formerly+Allied+Electronics), ComponentLink10URL=https://datasheet.octopart.com:443/AQY412S-Panasonic-datasheet-9700424.pdf?src-supplier=RS+(Formerly+Allied+Electronics), ComponentLink11Description=https://datasheet.octopart.com:443/AQY412S-Panasonic-datasheet-14176184.pdf?src-supplier=iiiC, ComponentLink11URL=https://datasheet.octopart.com:443/AQY412S-Panasonic-datasheet-14176184.pdf?src-supplier=iiiC, Contact Plating="Tin Bismuth", Country of Origin=Japan, Data Polarity=AC/DC, Export Control Classification Number (ECCN) Code=EAR99, Harmonized Tariff Schedule (HTS) Code=8541.40.95.00, Height=2.1mm, Introduction Date=2005-10-06, Lead Free="Lead Free", Length=4.4mm, Lifecycle Status=Production, Load Current=500mA, Manufacturer Part Number=AQY412S, Max Length=4.4mm, Max Output current=500mA, Mounting Technology="Surface Mount", Number of Elements=1, Output Current=500mA, Output Voltage=60V, Packaging=Box, Pins=4, Radiation Hardening=No, REACH SVHC=Unaffected, Relay Type=Relay, RoHS=Compliant, Stock=46, Supplier=Farnell, Supplier Part Number=AQY412S, Termination="Gull Wing", Throw Configuration=SPST, Width=4.3mm
Q1: "Transistor, MOSFET, P-Channel, 30V, 3.8A, 1.08W, SOT-23, SMD", Case/Package=SOT-23, Continuous Drain Current (ID)=3.8A, Drain to Source Breakdown Voltage=-30V, Drain to Source Resistance=65mΩ, Gate to Source Voltage (Vgs)=20V, Input Capacitance=563pF, Manufacturer="Diodes Inc.", Max Junction Temperature (Tj)=150°C, Max Power Dissipation=1.08W, Min Breakdown Voltage=30V, Min Operating Temperature=-55°C, Ratings=AEC-Q101, Supplier Part Number=8270503P, Threshold Voltage=-2.1V, Category=MOSFETs, China RoHS=Compliant, ComponentLink1Description=https://datasheet.octopart.com:443/DMP3099L-7-Diodes-Inc.-datasheet-171818965.pdf?src-supplier=Newark, ComponentLink1URL=https://datasheet.octopart.com:443/DMP3099L-7-Diodes-Inc.-datasheet-171818965.pdf?src-supplier=Newark, ComponentLink2Description=https://datasheet.octopart.com:443/DMP3099L-7-Diodes-Inc.-datasheet-17559051.pdf?src-supplier=Newark, ComponentLink2URL=https://datasheet.octopart.com:443/DMP3099L-7-Diodes-Inc.-datasheet-17559051.pdf?src-supplier=Newark, ComponentLink3Description=https://sigma.octopart.com:443/138706058/technical_drawing/Diodes-Inc.-DMP3099L-7.pdf?src-supplier=Diodes+Inc+SCT, ComponentLink3URL=https://sigma.octopart.com:443/138706058/technical_drawing/Diodes-Inc.-DMP3099L-7.pdf?src-supplier=Diodes+Inc+SCT, Contact Plating=Tin, Country of Origin="Mainland China", Drain to Source Voltage (Vds)=-30V, Element Configuration=Single, Export Control Classification Number (ECCN) Code=EAR99, Fall Time=15ns, Height=1.1mm, Introduction Date=2013-05-28, Lead Free="Lead Free", Length=3mm, Lifecycle Status=Production, Manufacturer Part Number=DMP3099L-7, Max Operating Temperature=150°C, Mounting Technology="Surface Mount", Number of Channels=1, Number of Elements=1, Number of Terminals=3, Pins=3, Power Dissipation=1.08W, Radiation Hardening=No, Rds On Max=65mΩ, REACH SVHC=Unaffected, Rise Time=5ns, RoHS=Compliant, Schedule B="8541290080, 8541290080|8541290080|8541290080|8541290080|8541290080", Stock=444300, Supplier=RS, Turn-Off Delay Time=31ns, Turn-On Delay Time=4.8ns, Weight=7.994566mg, Width=1.4mm
R101: library part Resistor, "Generic resistor", Manufacturer=YAGEO, Manufacturer Part Number=AC0603FR-07150KL, Power Rating=100mW, Tolerance=1%
R102 R210: library part Resistor, "Generic resistor", Manufacturer=YAGEO, Manufacturer Part Number=AC0603FRE0710KL, Power Rating=100mW, Tolerance=1%
R103 R106 R212 R214: library part Resistor, "Generic resistor", Manufacturer=YAGEO, Manufacturer Part Number=AC0603JR-07100KL, Power Rating=100mW, Tolerance=5%
R104: library part Resistor, "Generic resistor", Manufacturer=YAGEO, Manufacturer Part Number=AT0603BRD0749K9L, Power Rating=100mW, Tolerance=0.1%
R105: library part Resistor, "Generic resistor", Manufacturer=YAGEO, Manufacturer Part Number=AC0603FR-07430RL, Power Rating=100mW, Tolerance=1%
R107: library part Resistor, "Generic resistor", Manufacturer=YAGEO, Manufacturer Part Number=AC0603FR-07330RL, Power Rating=100mW, Tolerance=1%
R201 R202 R203 R208: library part Resistor, "Generic resistor", Manufacturer=YAGEO, Manufacturer Part Number=AC0603FR-0749R9L, Power Rating=100mW, Tolerance=1%
R204 R207 R209 R211 R213: library part Resistor, "Generic resistor", Manufacturer=YAGEO, Manufacturer Part Number=AC0603FR-071KL, Power Rating=100mW, Tolerance=1%
R205 R206: library part Resistor, "Generic resistor", Manufacturer=YAGEO, Manufacturer Part Number=AC0603FR-0756RL, Power Rating=100mW, Tolerance=1%
R215: library part Resistor
TP1 TP2: library part TestPoint
U1: "10 MHz to 20 GHz Integrated Vector Network Analyzer Front End", Manufacturer="Analog Devices", Manufacturer Lifecycle Status=PRODUCTION, Category=Uncategorized, ComponentLink1Description=https://octopart.com:443/opatz8j6/c1?t=sNn__E9if7phYpKIGt1HGors_3fkiZxAOk72fyHCpcdGdEVv4rI4oJjph59vRY8RkB2W6v6FUDb5vdq2LBbZOBejgV7lxPf1byVkt5o1bTHGBtKKZ6Tb3MUQ4F5jve5jIWWR5DzlCFF3u66MTO-qwqQC24WdVR_dh-itx28DAXgluqoEWVUgxFMfBbjVdfTk_KnL56IoFFq5EsB3mzvz68whwf5lUIDgQKXuAkuEH9EekJ4yxnZRnlukBpMqeuNE75q6lyql7jt9fMK9L5vifS7jSQ0phH-iyEfXCpMlEKgYs4T2ZLlJAKc&src-supplier=Analog+Devices, ComponentLink1URL=https://octopart.com:443/opatz8j6/c1?t=sNn__E9if7phYpKIGt1HGors_3fkiZxAOk72fyHCpcdGdEVv4rI4oJjph59vRY8RkB2W6v6FUDb5vdq2LBbZOBejgV7lxPf1byVkt5o1bTHGBtKKZ6Tb3MUQ4F5jve5jIWWR5DzlCFF3u66MTO-qwqQC24WdVR_dh-itx28DAXgluqoEWVUgxFMfBbjVdfTk_KnL56IoFFq5EsB3mzvz68whwf5lUIDgQKXuAkuEH9EekJ4yxnZRnlukBpMqeuNE75q6lyql7jt9fMK9L5vifS7jSQ0phH-iyEfXCpMlEKgYs4T2ZLlJAKc&src-supplier=Analog+Devices, ComponentLink2Description=http://sigma.octopart.com:80/conflict_mineral_statement/Analog-Devices-company-33.pdf?src-supplier=Compliance+Statements, ComponentLink2URL=http://sigma.octopart.com:80/conflict_mineral_statement/Analog-Devices-company-33.pdf?src-supplier=Compliance+Statements, ComponentLink3Description=https://octopart.com:443/opatz8j6/c1?t=wHYJiqXauK4GQM2tQ_zDqUa69f3N-5zA8TKZKGG1nxLidXH63u1cM0l-QN9E_93qqH5iv-1ZwJaGS180fzg_5Oe7Zc70L6wz2jI3y8w5lOGbgZyt_6NHhOm9jFHXaC4goDV5tsi3ZeeHrBwAQ6jdg7bzlT8NTI2okqPMewkI4fW6NGQpSGyHBCKZ0RyHdS3IP7gHGcc2ag_P3vSw00v3vkIXauamRiOkOWDHR5I_2w_ejY6bXPncjy1qH_sL9J1lP9Udtz3B5do7UwqucEogziSC9qVfJGWqMtIPTtJ4546mLJoeyxvlv0E&src-supplier=Compliance+Statements, ComponentLink3URL=https://octopart.com:443/opatz8j6/c1?t=wHYJiqXauK4GQM2tQ_zDqUa69f3N-5zA8TKZKGG1nxLidXH63u1cM0l-QN9E_93qqH5iv-1ZwJaGS180fzg_5Oe7Zc70L6wz2jI3y8w5lOGbgZyt_6NHhOm9jFHXaC4goDV5tsi3ZeeHrBwAQ6jdg7bzlT8NTI2okqPMewkI4fW6NGQpSGyHBCKZ0RyHdS3IP7gHGcc2ag_P3vSw00v3vkIXauamRiOkOWDHR5I_2w_ejY6bXPncjy1qH_sL9J1lP9Udtz3B5do7UwqucEogziSC9qVfJGWqMtIPTtJ4546mLJoeyxvlv0E&src-supplier=Compliance+Statements, Lifecycle Status=Production, Manufacturer Part Number=ADL5960ACCZ, Stock=30, Supplier=Farnell, Supplier 1=Farnell, Supplier Part Number=ADL5960ACCZ, Supplier Part Number 1=ADL5960ACCZ
U2: library part LT3045HDD, Case/Package=DFN, Manufacturer="Analog Devices", Manufacturer Lifecycle Status=PRODUCTION, Manufacturer Part Number=LT3045HDD#TRPBF, Category="LDO Voltage Regulators", Lifecycle Status=Production, Pins=10, RoHS=Compliant
U3: library part TLV75533PDBVR, "500mA high-PSRR low-IQ low-dropout voltage regulator with enable 5-SOT-23 -40 to 125", Ambient Temperature Range High=70°C, Case/Package=SOT-23, Dropout Voltage=150mV, Manufacturer="Texas Instruments", Manufacturer Lifecycle Status=ACTIVE, Max Junction Temperature (Tj)=125°C, Max Supply Voltage=5.5V, Min Operating Temperature=-40°C, Min Supply Voltage=1.45V, Output Current=500mA, Output Voltage=3.3V, Supplier Part Number=595-TLV75533PDBVR, Accuracy=1%, Category="LDO Voltage Regulators", ComponentLink1Description=https://sigma.octopart.com:443/177332311/technical_drawing/Texas-Instruments-TLV75533PDBVR.pdf?src-supplier=Texas+Instruments, ComponentLink1URL=https://sigma.octopart.com:443/177332311/technical_drawing/Texas-Instruments-TLV75533PDBVR.pdf?src-supplier=Texas+Instruments, ComponentLink2Description=https://octopart.com:443/opatz8j6/c1?t=OF4MY8j2GA053KXj_Rbi0lwcRoOaeC9vdUWQTlFE7L30B59HVjSj8orL1cO7i2UbJ9jLCuoxIIGp2turddIIp3WU7w4ILCIJQAdNHCr4Uz2XRSgoeoBnimB_7HG8tHaXeIQTPep1GQnTFNbHhkWVJJHBreV00-L0n-dDLSyLNgnSOYK5ptxy90HGUV8QmDiVKz2oakT4HfE98kP1BLs3kDyqsBGBGrhBwGMh32VdvwUpTsSrcOQpS_Uw1BfDnwhI3k9BdSneUSAtzrf09OPWFRnetYmhuydrape5EZwG80Fvpz037shPIUgx6ap4yn0eXGFYYe_7s1apKPt28Ei4Gc1NGcwNhnhkvN9aMFvs1F_KimyCvgN9K29ugjhLTEgeGLjTJw&src-supplier=Texas+Instruments, ComponentLink2URL=https://octopart.com:443/opatz8j6/c1?t=OF4MY8j2GA053KXj_Rbi0lwcRoOaeC9vdUWQTlFE7L30B59HVjSj8orL1cO7i2UbJ9jLCuoxIIGp2turddIIp3WU7w4ILCIJQAdNHCr4Uz2XRSgoeoBnimB_7HG8tHaXeIQTPep1GQnTFNbHhkWVJJHBreV00-L0n-dDLSyLNgnSOYK5ptxy90HGUV8QmDiVKz2oakT4HfE98kP1BLs3kDyqsBGBGrhBwGMh32VdvwUpTsSrcOQpS_Uw1BfDnwhI3k9BdSneUSAtzrf09OPWFRnetYmhuydrape5EZwG80Fvpz037shPIUgx6ap4yn0eXGFYYe_7s1apKPt28Ei4Gc1NGcwNhnhkvN9aMFvs1F_KimyCvgN9K29ugjhLTEgeGLjTJw&src-supplier=Texas+Instruments, ComponentLink3Description=https://sigma.octopart.com:443/175570406/technical_drawing/Texas-Instruments-TLV75533PDBVR.pdf?src-supplier=Texas+Instruments, ComponentLink3URL=https://sigma.octopart.com:443/175570406/technical_drawing/Texas-Instruments-TLV75533PDBVR.pdf?src-supplier=Texas+Instruments, ComponentLink4Description=https://sigma.octopart.com:443/169406034/technical_drawing/Texas-Instruments-TLV75533PDBVR.pdf?src-supplier=Texas+Instruments, ComponentLink4URL=https://sigma.octopart.com:443/169406034/technical_drawing/Texas-Instruments-TLV75533PDBVR.pdf?src-supplier=Texas+Instruments, ComponentLink5Description=https://sigma.octopart.com:443/155939316/technical_drawing/Texas-Instruments-TLV75533PDBVR.pdf?src-supplier=Texas+Instruments, ComponentLink5URL=https://sigma.octopart.com:443/155939316/technical_drawing/Texas-Instruments-TLV75533PDBVR.pdf?src-supplier=Texas+Instruments, ComponentLink6Description=https://sigma.octopart.com:443/102331370/technical_drawing/Texas-Instruments-TLV75533PDBVR.pdf?src-supplier=Texas+Instruments, ComponentLink6URL=https://sigma.octopart.com:443/102331370/technical_drawing/Texas-Instruments-TLV75533PDBVR.pdf?src-supplier=Texas+Instruments, ComponentLink7Description=https://datasheet.octopart.com:443/TLV75533PDBVR-Texas-Instruments-datasheet-150455022.pdf?src-supplier=Augswan, ComponentLink7URL=https://datasheet.octopart.com:443/TLV75533PDBVR-Texas-Instruments-datasheet-150455022.pdf?src-supplier=Augswan, ComponentLink8Description=https://datasheet.octopart.com:443/TLV75533PDBVR-Texas-Instruments-datasheet-165804640.pdf?src-supplier=LCSC, ComponentLink8URL=https://datasheet.octopart.com:443/TLV75533PDBVR-Texas-Instruments-datasheet-165804640.pdf?src-supplier=LCSC, ComponentLink9Description=https://datasheet.octopart.com:443/TLV75533PDBVR-Texas-Instruments-datasheet-159117836.pdf?src-supplier=LCSC, ComponentLink9URL=https://datasheet.octopart.com:443/TLV75533PDBVR-Texas-Instruments-datasheet-159117836.pdf?src-supplier=LCSC, ComponentLink10Description=http://sigma.octopart.com:80/reach_statement/Texas-Instruments-company-64.pdf?src-supplier=Compliance+Statements, ComponentLink10URL=http://sigma.octopart.com:80/reach_statement/Texas-Instruments-company-64.pdf?src-supplier=Compliance+Statements, ComponentLink11Description=http://sigma.octopart.com:80/conflict_mineral_statement/Texas-Instruments-company-63.pdf?src-supplier=Compliance+Statements, ComponentLink11URL=http://sigma.octopart.com:80/conflict_mineral_statement/Texas-Instruments-company-63.pdf?src-supplier=Compliance+Statements, Height=1.45mm, Length=2.9mm, Lifecycle Status=Production, Manufacturer Part Number=TLV75533PDBVR, Max Operating Temperature=125°C, Number of Channels=1, Number of Outputs=1, Pins=5, Pricing="1=0.42, 10=0.293, 50=0.262, 100=0.226, 1000=0.191, 10000=0.175 (USD)", RoHS=Compliant, Schedule B=8542390000, Supplier=Mouser, Thickness=1.2mm, Width=1.6mm

## Nets (pads, with @x,y where several pads share a name; then routed paths per layer and width w, separated by ;. In a path a pad name is that pad's centre, name@x,y a point inside that pad or via, vN(x,y) a via of type N, cw(c..) or ccw(c..) an arc to the next point about the centre after c; other vN are vias at no path point)
5V_PG: C106.2 R106.1 U2.4 U3.3
+3V3: C107.2 C216.2 C217.1 R107.2 R210.1 TP2.1 U1.22 U3.5
+5: C103.2 C105.2 C201.1 C202.2 C206.1 C207.2 C213.1 C214.2 R101.1 R106.2 TP1.1 U1.1 U1.8 U1.14 U2.9 U2.10 U3.1
+6: C101.1 C102.2 D1.1 Q1.2 U2.1 U2.2 U2.3
ALL_PG: J12.20 J13.20 K1.4
CS: J11.2 J11.4 J11.6 J11.8 R207.2 R210.2
CS0: J11.1 J12.10 J13.10
CS1: J11.3 J12.11 J13.11
CS2: J11.5 J12.12 J13.12
CS3: J11.7 J12.13 J13.13
EN: J12.8 J13.8 R211.1
GND: C101.2 C102.1 C103.1 C104.1 C105.1 C106.1 C107.1 C201.2 C202.1 C206.2 C207.1 C209.1 C213.2 C214.1 C216.1 C217.2 J1.2 J2.2 J3.2 J4.2 J5.2 J6.2 J7.2 J8.2 J9.2 J10.2 J12.1 J12.3 J12.5 J12.7 J12.9 J12.14 J12.17 J12.18 J12.19 J13.1 J13.3 J13.5 J13.7 J13.9 J13.14 J13.17 J13.18 J13.19 J14.1 J15.2 K1.2 K1.3 R102.2 R103.1 R104.1 R105.1 R205.1 R206.1 R212.1 R214.1 U1.2 U1.4 U1.18 U1.20 U1.27 U2.8 U2.11 U3.2
IFF_N: R202.2 U1.6
IFF_P: R201.2 U1.7
IFR_N: R208.2 U1.16
IFR_P: R203.2 U1.15
LO_N: C208.2 U1.10
LO_P: C204.2 U1.9
NetC104_2: C104.2 R104.2 U2.7
NetC203_1: C203.1 R201.1
NetC203_2: C203.2 J5.1
NetC204_1: C204.1 J2.1
NetC205_1: C205.1 R202.1
NetC205_2: C205.2 J6.1
NetC208_1: C208.1 J3.1
NetC209_2: C209.2 U1.5
NetC210_1: C210.1 R203.1
NetC210_2: C210.2 J7.1
NetC211_1: C211.1 J9.1 R205.2
NetC211_2: C211.2 U1.12
NetC212_1: C212.1 J10.1 R206.2
NetC212_2: C212.2 U1.13
NetC215_1: C215.1 R208.1
NetC215_2: C215.2 J8.1
NetD1_2: D1.2 Q1.1 R103.2
NetJ14_2: J14.2 Q1.3
NetJ15_1: J15.1 R215.1
NetK1_1: K1.1 R107.1
NetR101_2: R101.2 R102.1 U2.6
NetR105_2: R105.2 U2.5
NetR204_1: R204.1 U1.25
NetR207_1: R207.1 U1.24
NetR209_1: R209.1 U1.23
NetR211_2: R211.2 R212.2 U1.26
NetR213_2: R213.2 R214.2 R215.2 U1.11
RF_IN: J1.1 U1.3 | length 0
RF_OUT: J4.1 U1.19 | length 0
RSVD1: J12.15 J13.15
RSVD2: J12.16 J13.16
SCK: J12.2 J13.2 R204.2
SDIO: J12.4 J13.4 R209.2
SYNC: J12.6 J13.6 R213.1
TEMP: U1.21
VCM: U1.17
pads on no net: J1.MH1 J1.MH2 J2.MH1 J2.MH2 J3.MH1 J3.MH2 J4.MH1 J4.MH2 J5.MH1 J5.MH2 J6.MH1 J6.MH2 J7.MH1 J7.MH2 J8.MH1 J8.MH2 J9.MH1 J9.MH2 J10.MH1 J10.MH2 J15.MH1 J15.MH2 U3.4

## Other copper
Top Layer:
  region net GND: -0.645,3.137 -0.643,3.136 -0.641,3.135 -0.639,3.134 -0.637,3.133 -0.635,3.133 -0.633,3.132 -0.63,3.132 0.819,3.132 0.822,3.132 0.824,3.133 0.826,3.133 0.829,3.134 0.831,3.135 0.833,3.136 0.834,3.137 0.836,3.139 0.837,3.141 0.839,3.142 0.84,3.144 0.841,3.146 0.842,3.148 0.842,3.151 0.843,3.153 0.843,3.155 0.843,3.156 0.843,3.157 0.843,4.198 0.89,4.198 0.89,4.374 0.89,4.375 0.89,4.377 0.89,4.378 0.889,4.38 0.889,4.381 0.889,4.383 0.889,4.384 0.889,4.386 0.889,4.387 0.888,4.389 0.888,4.39 0.888,4.392 0.888,4.393 0.887,4.395 0.887,4.396 0.887,4.398 0.428,4.398 0.381,4.445 -0.19,4.445 -0.238,4.398 -0.698,4.398 -0.698,4.396 -0.698,4.395 -0.698,4.393 -0.699,4.392 -0.699,4.39 -0.699,4.389 -0.699,4.387 -0.7,4.386 -0.7,4.384 -0.7,4.383 -0.7,4.381 -0.7,4.38 -0.701,4.378 -0.701,4.377 -0.701,4.375 -0.701,4.374 -0.701,4.198 -0.654,4.198 -0.654,3.157 -0.654,3.156 -0.654,3.155 -0.654,3.153 -0.653,3.151 -0.653,3.148 -0.652,3.146 -0.651,3.144 -0.65,3.142 -0.648,3.141 -0.647,3.139
  region net GND: -0.703,5.221 -0.703,5.222 -0.703,5.224 -0.703,5.226 -0.703,5.228 -0.703,5.232 -0.703,5.237 -0.702,5.241 -0.702,5.246 -0.701,5.25 -0.7,5.254 -0.699,5.259 -0.697,5.263 -0.696,5.267 -0.694,5.271 -0.692,5.275 -0.69,5.279 -0.688,5.283 -0.686,5.287 -0.683,5.29 -0.681,5.294 -0.678,5.296 -0.674,5.301 -0.668,5.306 -0.661,5.313 -0.653,5.322 -0.644,5.33 -0.634,5.34 -0.624,5.349 -0.615,5.358 -0.606,5.367 -0.597,5.376 -0.589,5.383 -0.583,5.389 -0.578,5.394 -0.575,5.397 -0.574,5.398 0.887,5.401 0.887,5.395 0.888,5.389 0.888,5.383 0.889,5.376 0.889,5.37 0.89,5.364 0.89,5.358 0.89,5.352 0.891,5.345 0.891,5.339 0.891,5.333 0.891,5.327 0.891,5.32 0.892,5.314 0.892,5.308 0.892,5.302 0.892,5.295 0.892,5.289 0.891,5.283 0.891,5.277 0.891,5.271 0.891,5.264 0.891,5.258 0.89,5.252 0.89,5.246 0.89,5.239 0.889,5.233 0.889,5.227 0.888,5.221 0.888,5.215 0.887,5.208 0.887,5.202 0.428,5.202 0.378,5.152 -0.19,5.152 -0.24,5.199 -0.699,5.199 -0.7,5.201 -0.7,5.203 -0.701,5.205 -0.701,5.206 -0.701,5.208 -0.702,5.21 -0.702,5.212 -0.702,5.213 -0.703,5.215 -0.703,5.217 -0.703,5.219